# Altium PCB Gear_Trak-v1.0.PcbDoc (part 3 of 5)
Units mil, origin at the board's own origin, x right, y up, seen from the top; angles counter-clockwise.
Board outline 1383 x 2953 mil, 6 copper layers (TOP LAYER, GROUND1, SIGNAL, GROUND2, POWER, BOTTOM LAYER), stack 60.865 mil thick; 166 components, 125 nets, 751 pads, 771 vias.
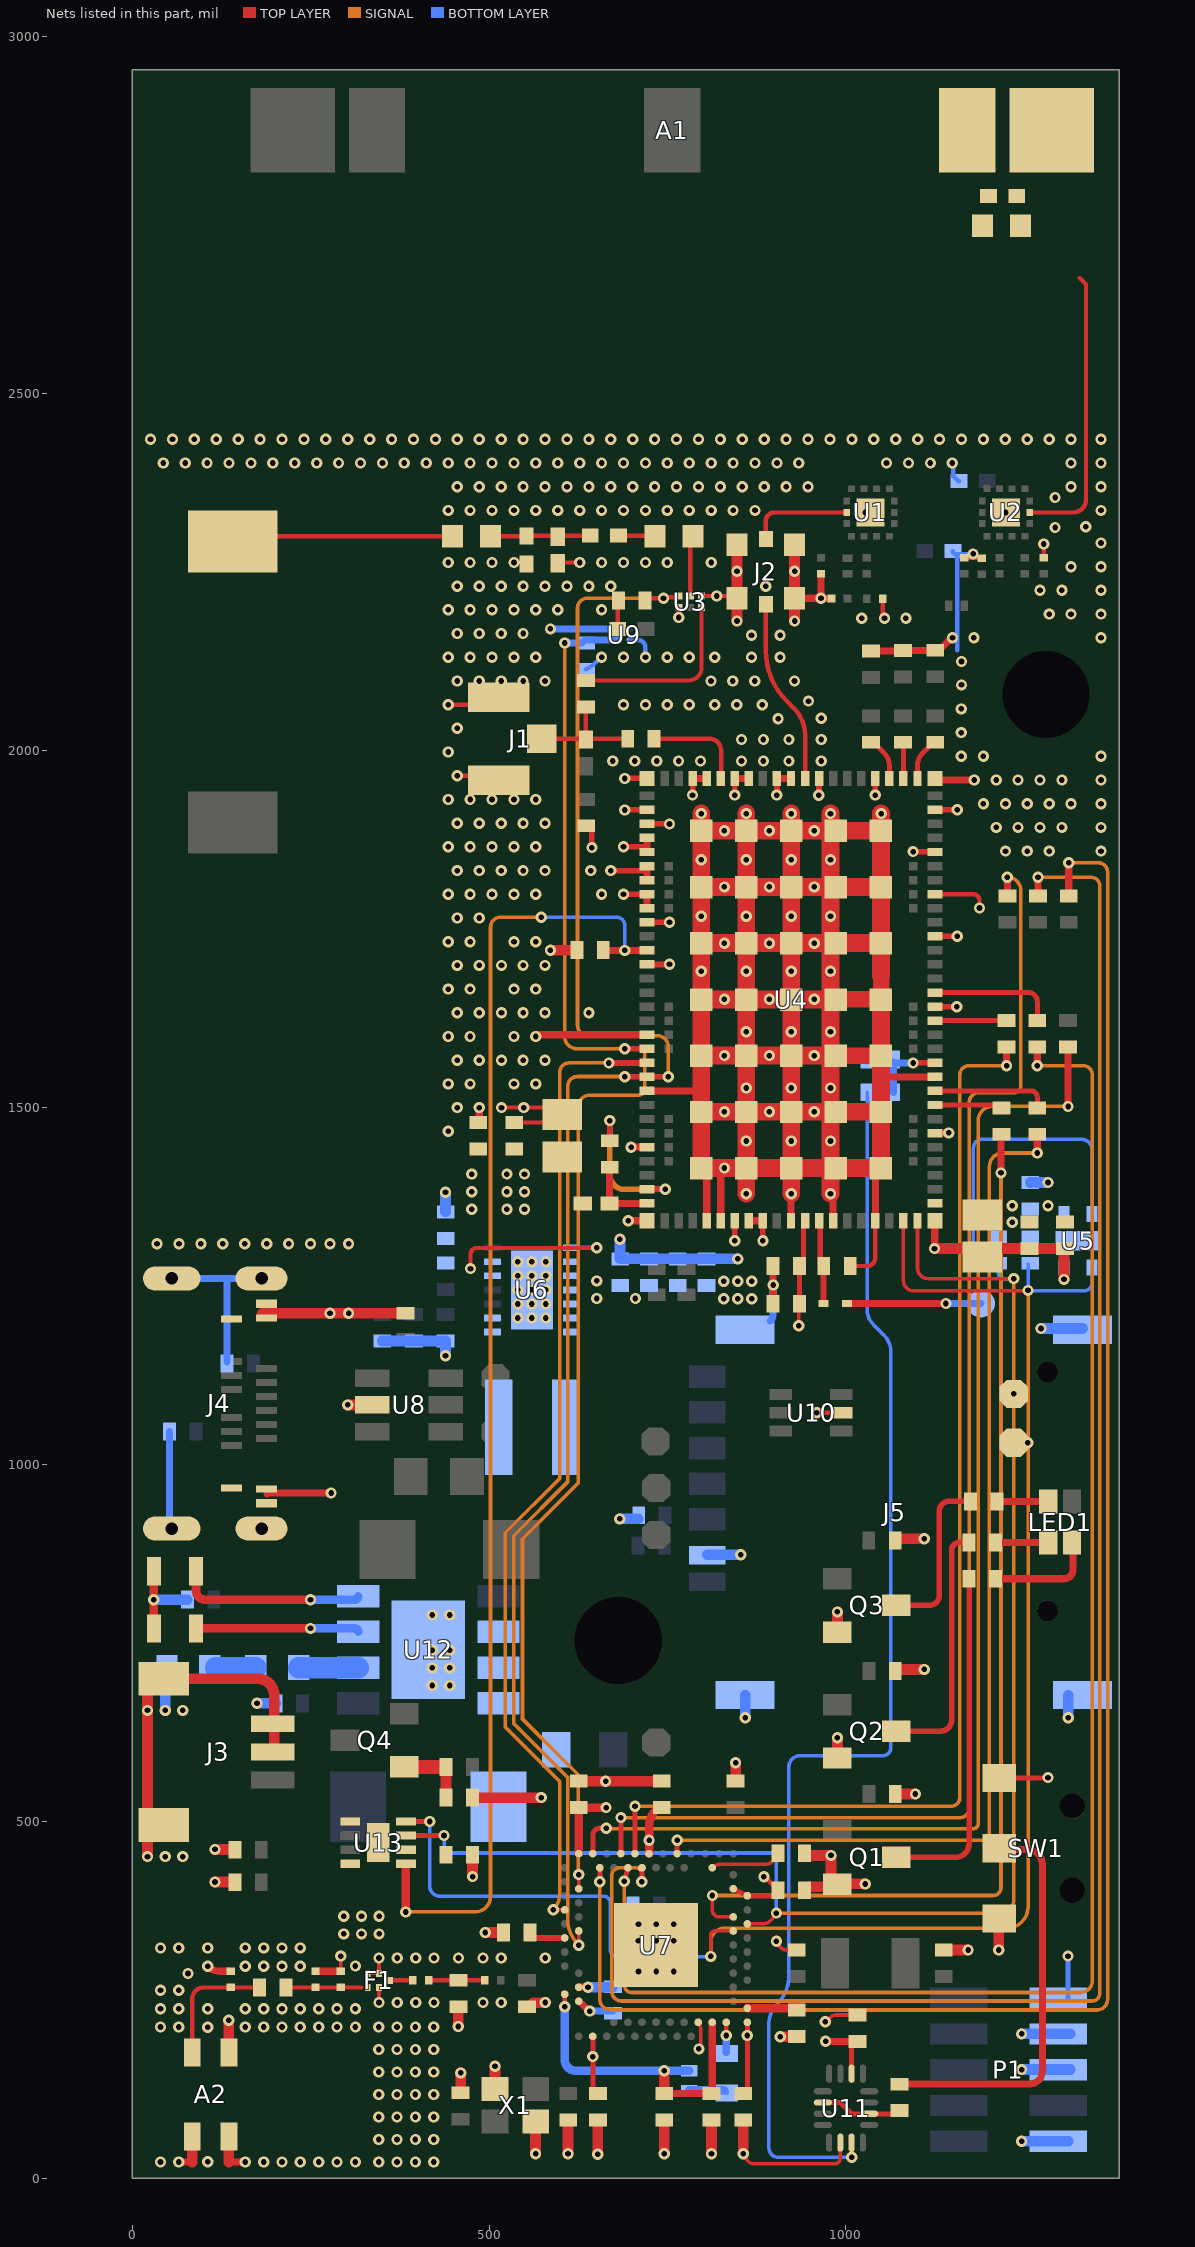
[diagram p6: the nets of this part, all layers, seen from the top]

## Part data (continued)
R15 R16: library part RC0402FR-075K1L, "RES 5.1K OHM 1% 1/16W 0402", Case Code (Imperial)=0402, Case Code (Metric)=1005, LCSC Part Number=C105872, Manufacturer=Yageo, Max Operating Temperature=155°C, Max Power Dissipation=63mW, Min Operating Temperature=-55°C, Package Quantity=1, Resistance=5.1kR, Resistance Tolerance=1%, Resistor Type="Thick Film", Temperature Coefficient=100ppm/°C, Voltage Rating=50V, Case/Package=0402, Category="Chip SMD Resistors", ComponentLink1Description=https://datasheet.ciiva.com/7983/1018594-7983519.pdf?src-supplier=Element14, ComponentLink1URL=https://datasheet.ciiva.com/7983/1018594-7983519.pdf?src-supplier=Element14, ComponentLink2Description=https://datasheet.ciiva.com/46394/1018594-46394936.pdf?src-supplier=Element14, ComponentLink2URL=https://datasheet.ciiva.com/46394/1018594-46394936.pdf?src-supplier=Element14, ComponentLink3Description=https://datasheet.ciiva.com/2453/pyu-r-int-thick-7-2453401.pdf?src-supplier=Digi-Key, ComponentLink3URL=https://datasheet.ciiva.com/2453/pyu-r-int-thick-7-2453401.pdf?src-supplier=Digi-Key, ComponentLink4Description=https://datasheet.ciiva.com/2453/pyu-r-int-thick-7-2453402.pdf?src-supplier=Digi-Key, ComponentLink4URL=https://datasheet.ciiva.com/2453/pyu-r-int-thick-7-2453402.pdf?src-supplier=Digi-Key, ComponentLink5Description=https://datasheet.ciiva.com/2453/pyu-r-int-thick-7-2453400.pdf?src-supplier=Digi-Key, ComponentLink5URL=https://datasheet.ciiva.com/2453/pyu-r-int-thick-7-2453400.pdf?src-supplier=Digi-Key, ComponentLink6Description=https://datasheet.ciiva.com/12558/pyu-rc0402-51-rohs-l-6-r-8721-12558460.pdf?src-supplier=Mouser, ComponentLink6URL=https://datasheet.ciiva.com/12558/pyu-rc0402-51-rohs-l-6-r-8721-12558460.pdf?src-supplier=Mouser, ComponentLink7Description=https://datasheet.ciiva.com/16744/pyu-rc0402-51-rohs-l-6-r-16744283.pdf?src-supplier=Future+Electronics, ComponentLink7URL=https://datasheet.ciiva.com/16744/pyu-rc0402-51-rohs-l-6-r-16744283.pdf?src-supplier=Future+Electronics, ComponentLink8Description=https://datasheet.ciiva.com/15189/getdatasheetpartid-323636-15189493.pdf?src-supplier=Verical, ComponentLink8URL=https://datasheet.ciiva.com/15189/getdatasheetpartid-323636-15189493.pdf?src-supplier=Verical, Construction=Rectangular, Depth=0.5mm, Features="Moisture Resistant", Height=0.016inch, Item Type=Resistor, Lead Free="Lead Free", Length=1mm, Manufacturer Part Number=RC0402FR-075K1L, Military Standard=Not, Number of Terminations=2, Packaging="Tape and Reel", Power Rating=63mW, Pricing 1="10000=0.00085 (USD)", RoHS=Yes, RoHS Compliant=Yes, Series=RC, Stock 1=65000, Supplier 1=Avnet, Supplier Part Number 1=RC0402FR-075K1L, Technology="THICK FILM", Termination=SMD/SMT, Tolerance=1%, Voltage Rating (DC)=50V, Width=0.02inch, Working Voltage=50V
R18 R43 R44: library part RC0402FR-070RL, "RES 0 OHM JUMPER 1/16W 0402", Case Code (Imperial)=0402, Case Code (Metric)=1005, LCSC Part Number=C106231, Manufacturer=Yageo, Max Operating Temperature=155°C, Max Power Dissipation=63mW, Min Operating Temperature=-55°C, Power Rating=62.5mW, Resistor Type="Thick Film", Supplier Part Number 1=603-RC0402FR-070RL, Temperature Coefficient=200ppm/°C, Tolerance=1%, Voltage Rating=50V, Case/Package=0402, ComponentLink1Description=https://datasheet.ciiva.com/8896/pyu-rc0402-51-rohs-l-6-8896149.pdf?src-supplier=Avnet, ComponentLink1URL=https://datasheet.ciiva.com/8896/pyu-rc0402-51-rohs-l-6-8896149.pdf?src-supplier=Avnet, ComponentLink2Description=https://datasheet.ciiva.com/16790/pyu-rc0402-51-rohs-l-6-r-16790444.pdf?src-supplier=Future+Electronics, ComponentLink2URL=https://datasheet.ciiva.com/16790/pyu-rc0402-51-rohs-l-6-r-16790444.pdf?src-supplier=Future+Electronics, Contact Plating=Tin,Matte, Features="Moisture Resistant", Height=0.35mm, Item Type=Resistors, Lead Free="Lead Free", Length=1mm, Manufacturer Part Number=RC0402FR-070RL, Mount="Surface Mount", Number of Terminations=2, Packaging="Tape and Reel", Pricing 1="1=0.10000, 10=0.01400, 50=0.01400, 100=0.00600, 1000=0.00300, 5000=0.00200, 10000=0.00100 (USD)", Radiation Hardening=No, Resistance=0R, RoHS=Yes, RoHS Compliant=Yes, Series=RC, Size Code=0402, Stock 1=8556842, Supplier 1=Mouser, Termination=SMD/SMT, Width=0.5mm
R19 R21: library part RC0402FR-07200RL, "RES 200 OHM 1% 1/16W 0402", Case Code (Imperial)=0402, Case Code (Metric)=1005, LCSC Part Number=C114764, Manufacturer=Yageo, Max Operating Temperature=155°C, Max Power Dissipation=63mW, Min Operating Temperature=-55°C, Package Quantity=1, Resistance Tolerance=1%, Resistor Type="Thick Film", Supplier Part Number 1=311-200LRCT-ND, Temperature Coefficient=100ppm/°C, Voltage Rating=50V, Case/Package=0402, Category="Chip SMD Resistors", ComponentLink1Description=https://datasheet.ciiva.com/2553/pyu-r-int-thick-7-2553232.pdf?src-supplier=Digi-Key, ComponentLink1URL=https://datasheet.ciiva.com/2553/pyu-r-int-thick-7-2553232.pdf?src-supplier=Digi-Key, ComponentLink2Description=https://datasheet.ciiva.com/7983/1018594-7983509.pdf?src-supplier=Element14, ComponentLink2URL=https://datasheet.ciiva.com/7983/1018594-7983509.pdf?src-supplier=Element14, ComponentLink3Description=https://datasheet.ciiva.com/16804/pyu-rc0402-51-rohs-l-6-r-16804406.pdf?src-supplier=Future+Electronics, ComponentLink3URL=https://datasheet.ciiva.com/16804/pyu-rc0402-51-rohs-l-6-r-16804406.pdf?src-supplier=Future+Electronics, ComponentLink4Description=https://datasheet.ciiva.com/15189/getdatasheetpartid-331152-15189383.pdf?src-supplier=Verical, ComponentLink4URL=https://datasheet.ciiva.com/15189/getdatasheetpartid-331152-15189383.pdf?src-supplier=Verical, ComponentLink5Description=https://datasheet.ciiva.com/7849/1018594-7849898.pdf?src-supplier=Element14, ComponentLink5URL=https://datasheet.ciiva.com/7849/1018594-7849898.pdf?src-supplier=Element14, ComponentLink6Description=https://datasheet.ciiva.com/5562/pyu-rc0402-51-rohs-l-6-r-8721-5562539.pdf?src-supplier=Mouser, ComponentLink6URL=https://datasheet.ciiva.com/5562/pyu-rc0402-51-rohs-l-6-r-8721-5562539.pdf?src-supplier=Mouser, ComponentLink7Description=https://datasheet.ciiva.com/7849/1018594-7849899.pdf?src-supplier=Element14, ComponentLink7URL=https://datasheet.ciiva.com/7849/1018594-7849899.pdf?src-supplier=Element14, ComponentLink8Description=https://datasheet.ciiva.com/2553/pyu-r-int-thick-7-2553230.pdf?src-supplier=Digi-Key, ComponentLink8URL=https://datasheet.ciiva.com/2553/pyu-r-int-thick-7-2553230.pdf?src-supplier=Digi-Key, ComponentLink9Description=https://datasheet.ciiva.com/2553/pyu-r-int-thick-7-2553231.pdf?src-supplier=Digi-Key, ComponentLink9URL=https://datasheet.ciiva.com/2553/pyu-r-int-thick-7-2553231.pdf?src-supplier=Digi-Key, Construction=Rectangular, Depth=0.5mm, Features="Moisture Resistant", Height=0.016inch, Lead Free="Lead Free", Length=1mm, Manufacturer Part Number=RC0402FR-07200RL, Military Standard=Not, Number of Terminations=2, Packaging="Tape and Reel", Power Rating=63mW, Pricing 1="1=0.10000, 10=0.01600, 100=0.00660, 1000=0.00299, 2500=0.00259, 5000=0.00214 (USD)", REACH SVHC="No SVHC", Resistance=200R, RoHS=Yes, RoHS Compliant=Yes, Series=RC, Size Code=0402, Stock 1=19778, Supplier 1=Digi-Key, Termination=SMD/SMT, Tolerance=1%, Voltage Rating (DC)=50V, Width=0.02inch
R20: library part RK73H1ETTP3300F, "RES 330 OHM 1% 1/10W 0402", Case Code (Imperial)=0402, Case Code (Metric)=1005, LCSC Part Number=C159971, Manufacturer="KOA Speer", Max Operating Temperature=155°C, Max Power Dissipation=100mW, Min Operating Temperature=-55°C, Package Quantity=10000, Power Rating=63mW, Ratings=AEC-Q200, Supplier Part Number=6317972, Temperature Coefficient=100ppm/°C, Tolerance=1%, Voltage Rating=50V, Case/Package=0402, Category="Chip SMD Resistors", ComponentLink1Description=https://datasheet.ciiva.com/5555/rk73h-5555909.pdf?src-supplier=Mouser, ComponentLink1URL=https://datasheet.ciiva.com/5555/rk73h-5555909.pdf?src-supplier=Mouser, ComponentLink2Description=https://datasheet.ciiva.com/15203/getdatasheetpartid-424481-15203100.pdf?src-supplier=Verical, ComponentLink2URL=https://datasheet.ciiva.com/15203/getdatasheetpartid-424481-15203100.pdf?src-supplier=Verical, Construction=Rectangular, Features="Moisture Resistant,Automotive AEC-Q200", Height=0.35mm, Lead Free="Lead Free", Length=1mm, Manufacturer Part Number=RK73H1ETTP3300F, Military Standard=Not, Number of Terminations=2, Packaging="Tape and Reel", Pricing="100=0.007, 1000=0.006, 2500=0.006, 5000=0.006, 10000=0.005 (GBP)", RoHS=Yes, RoHS Compliant=Yes, Series=RK73H, Stock=36500, Supplier=Rs, Termination=SMD/SMT, Voltage Rating (DC)=50V, Width=0.5mm
R26: library part RC0805FR-071KL, "RES 1K OHM 1% 1/8W 0805", Case Code (Imperial)=0805, Case Code (Metric)=2012, LCSC Part Number=C95781, Manufacturer=Yageo, Max Operating Temperature=155°C, Max Power Dissipation=125mW, Min Operating Temperature=-55°C, Package Quantity=1, Resistance Tolerance=1%, Resistor Type="Thick Film", Supplier Part Number=8126013, Temperature Coefficient=100ppm/°C, Voltage Rating=150V, Case/Package=0805, Category="Chip SMD Resistors", ComponentLink1Description=https://datasheet.ciiva.com/7941/1686128-7941719.pdf?src-supplier=Element14, ComponentLink1URL=https://datasheet.ciiva.com/7941/1686128-7941719.pdf?src-supplier=Element14, ComponentLink2Description=https://datasheet.ciiva.com/46385/444164-46385020.pdf?src-supplier=Element14, ComponentLink2URL=https://datasheet.ciiva.com/46385/444164-46385020.pdf?src-supplier=Element14, ComponentLink3Description=https://datasheet.ciiva.com/2456/pyu-r-int-thick-7-2456976.pdf?src-supplier=Digi-Key, ComponentLink3URL=https://datasheet.ciiva.com/2456/pyu-r-int-thick-7-2456976.pdf?src-supplier=Digi-Key, ComponentLink4Description=https://datasheet.ciiva.com/2456/pyu-r-int-thick-7-2456977.pdf?src-supplier=Digi-Key, ComponentLink4URL=https://datasheet.ciiva.com/2456/pyu-r-int-thick-7-2456977.pdf?src-supplier=Digi-Key, ComponentLink5Description=https://datasheet.ciiva.com/2456/pyu-r-int-thick-7-2456975.pdf?src-supplier=Digi-Key, ComponentLink5URL=https://datasheet.ciiva.com/2456/pyu-r-int-thick-7-2456975.pdf?src-supplier=Digi-Key, ComponentLink6Description=https://datasheet.ciiva.com/16850/rc0805-16850409.pdf?src-supplier=Future+Electronics, ComponentLink6URL=https://datasheet.ciiva.com/16850/rc0805-16850409.pdf?src-supplier=Future+Electronics, Construction=Rectangular, Depth=1.25mm, Features="Moisture Resistant", Height=0.024inch, Item Type=Resistor, Lead Free=5697LeadFree, Length=0.079inch, Manufacturer Part Number=RC0805FR-071KL, Military Standard=Not, Number of Terminations=2, Packaging="Tape and Reel", Pins=2, Power Rating=125mW, Pricing="5000=0.117, 25000=0.112, 125000=0.107, 500000=0.104, 1250000=0.0981 (USD)", Reach SVHC Compliant=No, RoHS=Yes, RoHS Compliant=Yes, Series=RC, Stock=8305000, Supplier="Future Electronics", Termination=SMD/SMT, Tolerance=1%, Voltage Rating (AC)=150V, Voltage Rating (DC)=150V, Width=0.049inch
R27: library part FRC0603F9530TS, "100mW Thick Film Resistors 75V ±100ppm/℃ ±1% 953Ω 0603 Chip Resistor - Surface Mount ROHS", LCSC Part Number=C2933268, Manufacturer=FOJAN, Package=0603, ComponentLink1Description=LCSC, ComponentLink1URL=https://www.lcsc.com/product-detail/Chip-Resistor-Surface-Mount_FOJAN-FRC0603F9530TS_C2933268.html, Item Type=Resistor, Manufacturer Part Number=FRC0603F9530TS
R28: library part RC0603FR-0715RL, "RES 15 OHM 1% 1/10W 0603", Current Rating=50mA, LCSC Part Number=C128059, Manufacturer=Yageo, Supplier Part Number=6308514, Voltage Rating (AC)=50V, Category="Chip SMD Resistors", ComponentLink1Description=https://datasheet.ciiva.com/5989/1686128-5989704.pdf?src-supplier=Farnell, ComponentLink1URL=https://datasheet.ciiva.com/5989/1686128-5989704.pdf?src-supplier=Farnell, ComponentLink2Description=https://datasheet.ciiva.com/8890/pyu-rc0603-51-rohs-l-4-8890742.pdf?src-supplier=Avnet, ComponentLink2URL=https://datasheet.ciiva.com/8890/pyu-rc0603-51-rohs-l-4-8890742.pdf?src-supplier=Avnet, ComponentLink3Description=https://datasheet.ciiva.com/12557/rc0603-272842-12557839.pdf?src-supplier=Mouser, ComponentLink3URL=https://datasheet.ciiva.com/12557/rc0603-272842-12557839.pdf?src-supplier=Mouser, ComponentLink4Description=https://datasheet.ciiva.com/2454/pyu-r-int-thick-7-2454840.pdf?src-supplier=Digikey, ComponentLink4URL=https://datasheet.ciiva.com/2454/pyu-r-int-thick-7-2454840.pdf?src-supplier=Digikey, ComponentLink5Description=https://datasheet.ciiva.com/2454/pyu-r-int-thick-7-2454841.pdf?src-supplier=Digikey, ComponentLink5URL=https://datasheet.ciiva.com/2454/pyu-r-int-thick-7-2454841.pdf?src-supplier=Digikey, ComponentLink6Description=https://datasheet.ciiva.com/2454/pyu-r-int-thick-7-2454842.pdf?src-supplier=Digikey, ComponentLink6URL=https://datasheet.ciiva.com/2454/pyu-r-int-thick-7-2454842.pdf?src-supplier=Digikey, ComponentLink7Description=https://datasheet.ciiva.com/7746/443971-7746262.pdf?src-supplier=Element14, ComponentLink7URL=https://datasheet.ciiva.com/7746/443971-7746262.pdf?src-supplier=Element14, ComponentLink8Description=https://datasheet.ciiva.com/7746/443971-7746263.pdf?src-supplier=Element14, ComponentLink8URL=https://datasheet.ciiva.com/7746/443971-7746263.pdf?src-supplier=Element14, Contact Material=157ConductorMaterial, Item Type=Resistor, Lead Free=5697LeadFree, Manufacturer Part Number=RC0603FR-0715RL, Pricing="5000=0.0011, 75000=0.001, 200000=0.001, 500000=0.001, 1250000=0.0009 (USD)", RoHS=Yes, Stock=5830000, Supplier="Future Electronics", Weight=250mg
R31 R32: library part RC0402FR-074K7L, "RES 4.7K OHM 1% 1/16W 0402", Case Code (Imperial)=0402, Case Code (Metric)=1005, LCSC Part Number=C105871, Manufacturer=Yageo, Max Operating Temperature=155°C, Max Power Dissipation=63mW, Min Operating Temperature=-55°C, Power Rating=62.5mW, Resistance=4.7kR, Resistance Tolerance=1%, Resistor Type="Thick Film", Temperature Coefficient=100ppm/°C, Voltage Rating=50V, Case/Package=0402, Category="Chip SMD Resistors", ComponentLink1Description=https://datasheet.ciiva.com/22661/1686128-22661342.pdf?src-supplier=Element14, ComponentLink1URL=https://datasheet.ciiva.com/22661/1686128-22661342.pdf?src-supplier=Element14, ComponentLink2Description=https://datasheet.ciiva.com/7850/1018594-7850022.pdf?src-supplier=Element14, ComponentLink2URL=https://datasheet.ciiva.com/7850/1018594-7850022.pdf?src-supplier=Element14, ComponentLink3Description=https://datasheet.ciiva.com/7850/1018594-7850023.pdf?src-supplier=Element14, ComponentLink3URL=https://datasheet.ciiva.com/7850/1018594-7850023.pdf?src-supplier=Element14, ComponentLink4Description=https://datasheet.ciiva.com/15215/getdatasheetpartid-328119-15215035.pdf?src-supplier=Verical, ComponentLink4URL=https://datasheet.ciiva.com/15215/getdatasheetpartid-328119-15215035.pdf?src-supplier=Verical, Construction=Rectangular, Depth=0.5mm, Features="Moisture Resistant", Height=0.32mm, Height - Seated (Max)=0.016inch, Item Type=Resistor, Lead Free="Lead Free", Length=1mm, Manufacturer Part Number=RC0402FR-074K7L, Military Standard=Not, Number of Pins=2, Number of Terminations=2, Packaging="Tape and Reel", Pricing 1="10000=0.00085 (USD)", Reach SVHC Compliant=Yes, RoHS=Yes, RoHS Compliant=Yes, Series=RC, Size Code=0402, Stock 1=2420000, Supplier 1=Avnet, Supplier Part Number 1=RC0402FR-074K7L, Termination=SMD/SMT, Tolerance=1%, Voltage Rating (DC)=50V, Width=0.5mm
SW1: library part AYZ0102AGRLC, "Miniature slide switch, SPDT, Right-Angle, ON-ON, 12V, 100mA", Digikey Part Number=401-2012-1-ND, LCSC=C92658, ComponentLink1Description=Datasheet, ComponentLink1URL=https://www.ckswitches.com/media/1431/ayz.pdf, ComponentLink2Description="Supplier link", ComponentLink2URL=N.A.
TP1: library part TP_SMD_Ø1.0MM, "1.0mm circular SMD testpad", Manufacturer="Nordic Semiconductor", Manufacturer Part Number=N.A., Artikkelnr Noca=N.A., Component Class=Connectors, ComponentLink1Description=Datasheet, ComponentLink1URL=N.A., ComponentLink2Description="Supplier link", ComponentLink2URL=N.A., Footprint Doc=TP_SMD_Ø1.0mm, HelpURL=N.A., LatestRevisionDate=2013-06-11, Note=N.A., Pad Count=1, PartId=100500475, Part Number=TP_SMD_Ø1.0MM, Part number IPS=N.A., Published=2013-06-11, Supplier 1=N.A., Supplier 2=N.A., Supplier Part Number 1=N.A., Supplier Part Number 2=N.A.
TP2 TP3 TP4 TP5 TP6 TP7 TP8 TP9: "Test Point ON", Item Type="Test Point", Manufacturer Part Number="TEST POINT 0.5mm Dia"
U1 U2: library part QM12038, "SP8T Switch For 3G/4G Applications", LCSC=C150871, Package=QFN-14, ComponentLink1Description=Datasheet, ComponentLink1URL="\\hizz\pro\app9717\Datasheet\integated circuits\qorvo\QM12038 Datasheet.pdf", ComponentLink2Description="Supplier link", ComponentLink2URL=N.A.
U3: library part BGA524N6E6327XTSA1, "GPS/GNSS Low-Noise Amplifier, 19.6dB Gain, 0.55dB Noise Figure, 1.5V to 3.3V Supply Range", Digikey Part Number=BGA524N6E6327XTSA1CT-ND, LCSC=C534158, Manufacturer="Infineon Technologies", Package=XFDFN-6, Part number IPS=00000004011, Component Class=Misc_ICs, ComponentLink1Description=Datasheet, ComponentLink1URL=https://www.infineon.com/dgdl/Infineon-BGA524N6-DS-v03_00-en.pdf?fileId=db3a304344e406b50144e44dfad302b9, ComponentLink2Description="Supplier link", ComponentLink2URL=N.A., HelpURL=https://www.infineon.com/cms/en/product/rf-wireless-control/low-noise-amplifier-lna-ics/gps-glonass-compass-lna/bga524n6/, LatestRevisionDate=2019-10-25, Manufacturer Part Number=BGA524N6E6327XTSA1, Note=N.A., Pad Count=6, PartId=101900596, Published=2019-10-25, Supplier Part Number 1=BGA524N6E6327XTSA1CT-ND, Supplier Part Number 2=726-A524N6E6327XTSA1
U4: "Low power System-in-Package with integrated LTE-M/NB-IoT modem and GPS", Digikey Part Number=4823-NRF9160-SICA-B1A-RCT-ND, LCSC=NILL, Manufacturer="Nordic Semiconductor", Part number IPS=80000002329, Artikkelnr Noca=N.A., Component Class=nRF_Devices, ComponentLink1Description=Datasheet, ComponentLink1URL=N.A., ComponentLink2Description="Supplier link", ComponentLink2URL=N.A., Footprint Doc=LGA-161, HelpURL=N.A., LatestRevisionDate=2020-08-13, Manufacturer Part Number=nRF9160-SICAB1A, Note=N.A., Pad Count=161, PartId=102000165, Part Number=nRF9160-SICAB1A, Published=2020-08-13, Supplier 1="Nordic Semiconductor", Supplier 2=N.A., Supplier Part Number 1=nRF9160-SICAB1A, Supplier Part Number 2=N.A.
U5: "SHTC3 Series Digital ±2% RH SMT Humidity Temperature Sensor - DFN-8", LCSC Part Number=C194656, Manufacturer=Sensirion, ComponentLink1Description=https://datasheet.octopart.com/SHTC3-TR-2.5KS-Sensirion-datasheet-166628637.pdf?src-supplier=Future+Electronics, ComponentLink1URL=https://datasheet.octopart.com/SHTC3-TR-2.5KS-Sensirion-datasheet-166628637.pdf?src-supplier=Future+Electronics, Item Type=IC, Manufacturer Part Number=SHTC3-TR-2.5KS, Pricing="1=2.72, 5=2.292, 10=2.129, 25=1.932, 50=1.7952, 100=1.6682, 500=1.40712, 1000=1.30776 (USD)", RoHS=No, Stock=21685, Supplier=Digikey
U6: "IC REG BUCK BST 3.3V 3.5A 14VSON", Case/Package=VSON, LCSC Part Number=C202140, Manufacturer="Texas Instruments", Max Operating Temperature=85°C, Max Output current=3A, Max Supply Voltage=5.5V, Min Input Voltage=1.8V, Min Operating Temperature=-40°C, Output Voltage=3.3V, Package Quantity=1, Quiescent Current=50uA, Switching Frequency=2.4MHz, ComponentLink1Description=https://datasheet.ciiva.com/2026/tps63021-2026362.pdf?src-supplier=Digikey, ComponentLink1URL=https://datasheet.ciiva.com/2026/tps63021-2026362.pdf?src-supplier=Digikey, ComponentLink2Description=https://datasheet.ciiva.com/2026/tps63021-2026361.pdf?src-supplier=Digikey, ComponentLink2URL=https://datasheet.ciiva.com/2026/tps63021-2026361.pdf?src-supplier=Digikey, ComponentLink3Description=https://datasheet.ciiva.com/2026/tps63021-2026363.pdf?src-supplier=Digikey, ComponentLink3URL=https://datasheet.ciiva.com/2026/tps63021-2026363.pdf?src-supplier=Digikey, ComponentLink4Description=https://datasheet.ciiva.com/3221/tps63020-3221510.pdf?src-supplier=Avnet, ComponentLink4URL=https://datasheet.ciiva.com/3221/tps63020-3221510.pdf?src-supplier=Avnet, Efficiency=96%, Item Type=IC, Lead Free="Lead Free", Manufacturer Part Number=TPS63021DSJR, Mounting Technology="Surface Mount", Number of Outputs=1, Operating Supply Voltage=5.5V, Output Current=3A, Output Type=Fixed, Packaging="Cut Tape", Pins=14, Pricing="1=2.63, 10=1.96, 50=1.8, 100=1.61, 1000=1.43, 10000=1.35 (USD)", Reach SVHC Compliant=No, RoHS=Yes, RoHS Compliant=Yes, Series=-, Stock=4678, Supplier=Mouser, Synchronous Rectifier=Yes
U7: "AQFN-73-EP(7x7) RF Transceiver ICs ROHS", LCSC=C190794, Package=QFN-73
U8: "6A 12V 150W 6V Unidirectional 5V SOT-23-6 ESD and Surge Protection (TVS/ESD) ROHS", LCSC Part Number=C2827654, Manufacturer="TECH PUBLIC", Package=SOT-23-6, ComponentLink1Description=LCSC, ComponentLink1URL=https://www.lcsc.com/product-detail/ESD-and-Surge-Protection-TVS-ESD_TECH-PUBLIC-USBLC6-2SC6_C2827654.html, Item Type=(TVS/ESD), Manufacturer Part Number=USBLC6-2SC6
U9: "1.0 A Load Switch IC with Slew Rate Control Driver in Ultra Small Package", LCSC=C146305, Manufacturer=Toshiba, Manufacturer Part Number=TCK106AG,LF, Part number IPS=00000004390, Supplier Part Number 1=TCK106AGLFTR-ND, Artikkelnr Noca=N.A., Component Class=Misc_ICs, ComponentLink1Description=Datasheet, ComponentLink1URL=https://toshiba.semicon-storage.com/info/docget.jsp?did=30131&prodName=TCK106AG, ComponentLink2Description="Supplier link", ComponentLink2URL=N.A., Footprint Doc=WLCSP-4, HelpURL=N.A., LatestRevisionDate=2019-03-01, Note=N.A., Pad Count=4, PartId=101900575, Part Number=TCK106AG, Published=2019-02-17, Supplier 1=Digi-Key, Supplier 2=Mouser, Supplier Part Number 2=757-TCK106AGLF
U10: "TVS DIODE 5VWM 12.5VC SC70-6", Capacitance=130pF, Case/Package=SC, Clamping Voltage=12.5V, LCSC=C85191, Leakage Current=5uA, Manufacturer=Semtech, Max Breakdown Voltage=6V, Max Operating Temperature=125°C, Min Operating Temperature=-55°C, Operating Supply Voltage=5V, Peak Pulse Current=8A, Peak Pulse Power=100W, Power Line Protection=No, Resistor Type=Zener, Supplier Part Number 1=SMF05CCT-ND, Test Current=1mA, Category="TVS Diodes", Clamping Voltage-Max=12.5V, ComponentLink1Description=https://datasheet.ciiva.com/338/smf05c-338385.pdf?src-supplier=Digi-Key, ComponentLink1URL=https://datasheet.ciiva.com/338/smf05c-338385.pdf?src-supplier=Digi-Key, ComponentLink2Description=https://datasheet.ciiva.com/18065/getdatasheetpartid-89007-18065142.pdf?src-supplier=Verical, ComponentLink2URL=https://datasheet.ciiva.com/18065/getdatasheetpartid-89007-18065142.pdf?src-supplier=Verical, ComponentLink3Description=https://datasheet.ciiva.com/338/smf05c-338386.pdf?src-supplier=Digi-Key, ComponentLink3URL=https://datasheet.ciiva.com/338/smf05c-338386.pdf?src-supplier=Digi-Key, ComponentLink4Description=https://datasheet.ciiva.com/338/smf05c-338387.pdf?src-supplier=Digi-Key, ComponentLink4URL=https://datasheet.ciiva.com/338/smf05c-338387.pdf?src-supplier=Digi-Key, ComponentLink5Description=https://datasheet.ciiva.com/16387/smf05c-16387308.pdf?src-supplier=Future+Electronics, ComponentLink5URL=https://datasheet.ciiva.com/16387/smf05c-16387308.pdf?src-supplier=Future+Electronics, Depth=1.25mm, Diode Type=ZENER, Direction=Unidirectional, Element Configuration="Common Anode", ESD Protection=Yes, Height=0.9mm, Lead Free="Lead Free", Length=2mm, Manufacturer Part Number=SMF05C.TCT, Max Reverse Leakage Current=5uA, Min Breakdown Voltage=6V, Mount="Surface Mount", Number of Channels=5, Number of Elements=5, Number of Pins=6, Number of Unidirectional Channels=5, Packaging="Tape and Reel", Polarity=Unidirectional, Pricing 1="1=0.79000, 10=0.69300, 100=0.53130, 500=0.42000, 1000=0.33600 (USD)", Radiation Hardening=No, Reverse Breakdown Voltage=6V, Reverse Standoff Voltage=5V, RoHS=Yes, RoHS Compliant=Yes, Series=SMF, Stock 1=164885, Supplier 1=Digi-Key, Voltage Rating (DC)=5V, Width=1.25mm, Working Voltage=5V
U11: "Data / Audio Low-Voltage Dual DPDT Analog Switch", LCSC=C457657, Manufacturer="ON Semiconductor", Part number IPS=00000009986, Supplier Part Number 1=FSA2466UMXCT-ND, Artikkelnr Noca=15070069, Component Class=Misc_ICs, ComponentLink1Description=Datasheet, ComponentLink1URL=N.A., ComponentLink2Description="Supplier link", ComponentLink2URL=N.A., Footprint Doc=UFQFN-16, HelpURL=https://www.onsemi.com/pub/Collateral/FSA2466-D.PDF, LatestRevisionDate=2019-05-15, Manufacturer Part Number=FSA2466UMX, Note=N.A., Pad Count=16, PartId=101900422, Part Number=FSA2466UMX, Published=2016-05-18, Supplier 1=Digi-Key, Supplier 2=Mouser, Supplier Part Number 2=512-FSA2466UMX
U12: "4V~6V Polymer 1 3.5A SOP-8-EP Battery Management ICs ROHS", LCSC Part Number=C130316, Manufacturer=SOLA-IC, Package=SOP-8-EP, ComponentLink1Description=LCSC, ComponentLink1URL=https://www.lcsc.com/product-detail/Battery-Management-ICs_SOLA-IC-SLM6600_C130316.html, Item Type=IC, Manufacturer Part Number=SLM6600
U13: "IC BATT MON LI-ION 1CELL 8TDFN", LCSC Part Number=C2682616, Manufacturer=Maxim, Max Operating Temperature=85°C, Min Operating Temperature=-20°C, Operating Supply Current=23uA, Operating Supply Voltage=4.5V, Output Voltage=400mV, Package Quantity=10000, Supplier Part Number 1=700-MAX17048G+T10, Category="Battery Management", ComponentLink1Description=https://datasheet.ciiva.com/14083/max17048-max17049-14083973.pdf?src-supplier=Digi-Key, ComponentLink1URL=https://datasheet.ciiva.com/14083/max17048-max17049-14083973.pdf?src-supplier=Digi-Key, Contact Plating=Tin,Matte, Item Type=IC, Manufacturer Part Number=MAX17048G+T10, Mount="Surface Mount", Number of Pins=8, Packaging="Tape and Reel", Pricing 1="1=3.34000, 10=3.00000, 50=2.84000, 100=2.46000, 1000=1.89000, 10000=1.83000 (USD)", Radiation Hardening=No, RoHS=Yes, RoHS Compliant=Yes, Series=ModelGauge™, Stock 1=41293, Supplier 1=Mouser
X1: library part XTAL_SMD2016_32MHz_8pF_Murata, "XTAL SMD 2016, 32MHz, Cl=8pF, Tol: ±10ppm, Stab: ±10ppm", LCSC=C2965582, Package=SMD-2016, ComponentLink1Description=Datasheet, ComponentLink1URL=N.A., ComponentLink2Description="Supplier link", ComponentLink2URL=N.A.
X2: library part Q13FC13500049, "Crystal, 32.768KHZ, 6PF, 3.2MM X 1.5MM Rohs Compliant: Yes", LCSC Part Number=C95361, Manufacturer=Epson, Item Type=Crystal, Manufacturer Part Number=Q13FC13500049, Pricing="100=5.52, 250=5.41 (DKK)", RoHS=No, Stock=760, Supplier=Farnell

## Free pads (board coordinates)
  round 0 hole 122.05: MH1(681,753) MH1(1280,2078)

## Via types
v1: diameter 15.75, hole 7.87, TOP LAYER to BOTTOM LAYER, tented both sides, 771 vias

## Nets (pads, with @x,y where several pads share a name; then routed paths per layer and width w, separated by ;. In a path a pad name is that pad's centre, name@x,y a point inside that pad or via, vN(x,y) a via of type N, cw(c..) or ccw(c..) an arc to the next point about the centre after c; other vN are vias at no path point)
+3V3: C14.2 C15.1 C16.1 C17.1 C18.1 C20.2 C21.1 C22.1 C25.1 C29.1 C31.2 C38.1 C40.1 C42.1 C45.2 C46.2 C47.2 C48.2 C60.1 FB1.1 P1.1 R29.1 R31.1 R32.1 SW1.3 U4.12 U4.22 U5.1 U6.3 U6.4 U6.5 U7.A22 U7.AD14 U7.AD23 U7.B1 U7.W1 U7.Y2 U9.A2 U11.14 | length 942.1
  TOP LAYER w5: v1(934,1194) 934,1223.66 cw(c934.98,1223.66) C18.1@934.98,1224.63
  TOP LAYER w7: U7.A22@645.31,198.54 645.31,123.78 C29.1@652.64,118.28 ; U7.AD14@724.06,454.45 U7.AD14@724.12,454.52 ; v1@724.12,474.12 v1@724.19,474.19 ; U7.Y2@842.17,405.24 U7.W1@861.85,395.39 C38.1@901.52,395.39 ; C31.2@856,118.5 ccw(c856,124.35) 861.85,124.35 U7.B1@861.85,218.23 ; v1(885,422) cw(c885,419.51) 886.75,421.28 C38.1@904.93,403.1 ; C18.1@934.98,1224.63 C17.1@934.99,1277.45 ; C17.1@940.61,1277.63 940.61,1338.86 U4.12@942.68,1340.94 ; v1(971.44,191.66) v1@971.52,191.58 ; U11.14@1007.87,146.23 1007.87,186 C60.1@1013.37,191.5 ; C60.1@1015.83,191.58 C60.1@1015.91,191.5 ; SW1.3@1214.64,560.48 1281.74,560.48 ccw(c1281.74,562.26) v1(1283,561)
  TOP LAYER w10: v1@971.52,191.58 C60.1@1015.83,191.58
  TOP LAYER w12: U7.AD23@625.5,454.58 C40.1@625.5,516 ; C40.1@625.63,519 v1(664,519) ; U7.AD14@724.12,454.52 v1@724.12,474.12 ; v1@724.19,474.19 724.19,491.3 cw(c761.12,491.3) C42.1@735.01,517.42
  TOP LAYER w15: v1(586,1720) R29.1@623,1720
  BOTTOM LAYER w7: P1.1@1311,252.03 v1(1311,311)
  BOTTOM LAYER w10: v1(586,2170) U9.A2@681.3,2170
  other v1: 645.31,170.15 861.85,199.79 724.19,473.19 651,1232 705,1232 828.63,1231.63 848.31,1231.63 868,1231.63 651,1256.69 828.63,1256.32 848.31,1256.32 868,1256.32 1233,1338.88 475.63,1357 525,1357 549.69,1357 1233,1362 1283,1362 475.63,1381.69 525,1381.69 549.69,1381.69 475.63,1406.37 525,1406.37 549.69,1406.37
ANT_GPS: C8.2 C9.1 L7.1 L8.2 | length 140
  TOP LAYER w6.17: L7.1@502.23,2299.54 552.02,2299.54 C9.1@552.7,2300.23 L8.2@596.25,2300.23 ; L8.2@596.27,2300.25 641.5,2300.25 C8.2@641.8,2300.54
ANT_LTE: A1.1 C1.1 L1.1 U2.13 | length 403.4
  TOP LAYER w6.17: U2.13@1257.17,2333.07 1318.18,2333.07 ccw(c1318.18,2351.12) 1336.23,2351.12 1336.23,2652.69 1327.44,2661.48
BAT_ALERT: R29.2 U4.84 U13.5 | length 1855.7
  TOP LAYER w5: R29.2@660,1719.68 R29.2@660,1720
  TOP LAYER w10: R29.2@660,1719.68 v1(690.13,1719.68) U4.84@721.43,1719.68
  TOP LAYER w12: v1(383.5,372.79) 383.57,372.86 383.57,440.41 U13.5@383.64,440.47
  SIGNAL w5: v1(383.5,372.79) 480.16,372.79 ccw(c480.16,394.68) 502.05,394.68 502.05,1752.33 cw(c515.72,1752.33) 515.72,1766 v1(573,1766)
  BOTTOM LAYER w5: v1(573,1766) 679,1766 cw(c679,1755) 690,1755 690,1719.68 v1(690.13,1719.68)
BLE_ANT: A2.1 C36.2 R18.1 | length 178.3
  TOP LAYER w6.17: A2.1@84.35,176.16 84.35,251.32 cw(c100.03,251.32) 100.03,267 138,267 158,267 R18.1@178.5,267
BLE_RF: F1.1 L12.2 | length 31.5
  TOP LAYER w6.17: F1.1@361.59,277.08 L12.2@393.13,277.08
COEX0: R3.2 U3.6 U4.93 U7.P23 | length 2386.8
  TOP LAYER w5: v1@625.62,326.27 U7.P23@625.63,346.18
  TOP LAYER w6.17: R3.2@718.5,2210 721.51,2213.01 v1@744.21,2213.01 ; v1(744.34,2212.88) 745.71,2214.26 764.34,2214.26 U3.6@766.13,2216.04
  TOP LAYER w7.87: v1@690.13,1542.65 v1@751,1542.65
  SIGNAL w5: v1(625.61,326.26) cw(c663.29,363.94) 610,363.94 610,561.56 534.85,636.71 534.85,899.85 610,975 610,1529 cw(c624,1529) 624,1543 690,1543 v1(690,1542.78) ; v1(744.34,2212.88) 637.53,2212.88 ccw(c637.53,2199.32) 623.97,2199.32 623.97,1615.03 ccw(c639,1615.03) 639,1600 736,1600 cw(c736,1585) 751,1585 v1@751,1543
  other v1: 751,1542.78
COEX1: U4.92 U7.U24 | length 1383.9
  TOP LAYER w5: v1@590,375.71 U7.U24@605.94,375.71
  TOP LAYER w7.87: v1(667.93,1562) U4.92@721.23,1562
  SIGNAL w5: v1(590,376) ccw(c568.27,397.73) 599,397.73 599,555.62 522.85,631.77 522.85,903.85 599,980 599,1548.6 cw(c612.4,1548.6) 612.4,1562 v1(667.93,1562)
COEX2: R34.2 U4.91 U7.Y23 U9.B2 | length 2102.7
  TOP LAYER w5: U7.Y23@625.63,405.24 v1@625.64,425.15
  TOP LAYER w7.87: v1@690.27,1581.88 U4.91@721.43,1581.88
  SIGNAL w5: v1(606,2150.25) 606,1599 ccw(c622.98,1599) 622.98,1582.02 v1(690.13,1582.02) 709.98,1582.02 cw(c709.98,1574) 718,1574 718,1525 cw(c710,1525) 710,1517 641,1517 ccw(c641,1501.12) 625.12,1501.12 624.92,1500.92 624.92,973.56 546.85,895.49 546.85,643.07 624.92,565 624.92,425.89 v1(625.65,425.16)
  BOTTOM LAYER w5: R34.2@630,2150.25 ccw(c630,2154.25) R34.2@634,2154.25
  BOTTOM LAYER w10: v1(606,2150.25) R34.2@630,2150.25 ; R34.2@634,2154.25 U9.B2@681.3,2154.25
DEC0: C19.1 D1.2 U4.13 | length 119
  TOP LAYER w7.87: U4.13@962.37,1340.94 964.14,1339.17 964.14,1282.19 C19.1@968.87,1277.45 968.46,1277.45 D1.2@968.46,1225
DEC1: C30.1 U7.C1 | length 67
  TOP LAYER w11.81: U7.C1@861.85,237.91 C30.1@928.9,237.91
DEC3: C32.1 U7.D23 | length 53.5
  TOP LAYER w10: U7.D23@625.63,247.76 v1(641.14,233.94)
  BOTTOM LAYER w10: v1(641.14,233.94) C32.1@673.83,233.94
DEC4_6: C57.2 C58.2 L14.2 U7.B5 U7.E24 | length 475.6
  TOP LAYER w5.91: U7.E24@605.94,257.6 605.94,240.14 v1(606,240.08) v1@606,238 ; C57.2@811.56,118.28 ccw(c808.96,120.88) C57.2@812.64,120.88
  TOP LAYER w10: C58.2@745.37,118.28 C57.2@811.56,118.28 ; C57.2@812.64,120.88 U7.B5@812.64,218.23
  TOP LAYER w15: C58.2@745.37,118.28 v1(745.37,150.35)
  BOTTOM LAYER w12: v1(606,240.08) 606,166 ccw(c621.65,166) 621.65,150.35 v1(745.37,150.35) L14.2@780.5,150.35
GND: A2.2 C5.2 C6.2 C7.2 C9.2 C10.1 C11.1 C14.1 C15.2 C16.2 C17.2 C18.2 C19.2 C20.1 C21.2 C22.2 C23.2 C24.1 C25.2 C26.1 C27.2 C28.2 C29.2 C30.2 C31.1 C32.2 C33.1 C34.1 C35.1 C36.1 C37.2 C38.2 C39.1 C40.2 C41.2 C42.2 C43.1 C44.1 C45.1 C46.1 C47.1 C48.1 C49.1 C50.2 C51.1 C52.1 C53.1 C54.2 C55.2 C56.1 C57.1 C58.1 C59.1 C60.2 CR1.1 F1.2 F1.3 F1.5 J1.2 J2.2 J3.0 J3.1 J3.2 J4.A1 J4.A12 J4.B1 J4.B12 J4.GND1 J4.GND2 J4.SH1 J4.SH2 J4.SH3 J4.SH4 J5.C5 J5.S1 J5.S2 J5.S3 J5.S4 L2.1 L3.1 L4.1 L5.1 L8.1 P1.3 P1.5 P1.9 Q1.2 Q2.2 Q3.2 R3.1 R7.2 R8.2 R9.2 R14.1 R15.2 R16.2 R22.1 R23.1 R24.1 R28.1 R30.1 R34.1 SW1.1 U1.15 U2.15 U3.1 U3.4 U4.1 U4.5 U4.6 U4.7 U4.8 U4.9 U4.11 U4.14 U4.17 U4.21 U4.27 U4.31 U4.36 U4.41 U4.44 U4.47 U4.50 U4.52 U4.56 U4.60 U4.62 U4.63 U4.65 U4.66 U4.68 U4.69 U4.72 U4.74 U4.75 U4.76 U4.77 U4.78 U4.79 U4.80 U4.81 U4.82 U4.85 U4.90 U4.94 U4.98 U4.103 U5.4 U5.5 U6.2 U6.15 U7.74 U7.B7 U7.F23 U8.2 U9.B1 U10.2 U11.6 U12.7 U12.9 U13.1 U13.4 U13.9 X1.2 X1.4 | length 11647.9
  TOP LAYER w5: CR1.1@292.14,289.66 v1(292.14,311) ; F1.3@330.1,286.91 F1.2@345.84,286.91 ; v1(345.84,245.88) F1.5@345.84,267.22 ; v1@572.9,532.9 v1(573,533) ; U7.B7@792.96,216.64 cw(c784.24,207.94) 796.56,207.94 v1@796.56,180.81 ; v1@794,182 v1@794,184.91 ; v1(856,34.2) 858,32.19 858.56,30.27 ccw(c872.2,34.2) 872.2,20 984,20 ccw(c984,28.13) 992.13,28.13 U11.6@992.13,49.77 ; v1(902.49,331.73) 906.64,325.18 ccw(c916.97,331.73) 916.97,319.5 C26.1@931,319.5 ; C38.2@941.93,403.1 C38.2@948.43,407.95 ; v1(971,219) 979.87,226.33 cw(c985.92,219) 985.92,228.5 C60.2@1015.91,228.5 ; Q1.2@978.76,407.95 Q1.2@987.81,411.82 Q1.2@979,424.32 ; SW1.1@1214,363 SW1.1@1214.64,363.64
  TOP LAYER w6: F1.2@345.84,286.91 v1(345.84,308.28) ; v1(442.8,2063.89) 503.29,2063.89 ccw(c503.29,2074.24) J1.2@513.64,2074.24 ; v1(455.65,1964.29) 507.45,1964.29 cw(c507.45,1958.1) J1.2@513.64,1958.1 ; C14.1@485,1478.5 C14.1@486.35,1479.85 ; v1(517.43,1499.49) v1(548.5,1499.49) C16.2@599,1499.49 ; v1(534.9,2263.09) 550.47,2263.09 cw(c550.47,2260.86) C9.2@552.7,2260.86 C9.2@552.82,2260.75 ; C15.2@535.38,1478.5 575.95,1478.5 ccw(c575.95,1516.15) C16.2@602.57,1489.53 ; L8.1@596.27,2261.85 cw(c597.51,2261.85) 597.51,2263.09 v1(627,2263.09) ; C11.1@680.43,2169.88 C11.1@680.31,2170 680.31,2208.82 R3.1@681.5,2210 ; v1@695,1340.94 v1(695,1341) ; v1(699,1444) v1@699,1444.09 ; 796.49,1522.83 cw(c796.49,1522) 797.31,1522 ; U4.103@797.31,1414.87 cw(c797.31,1407.29) U4.103@804.89,1407.29 ; U3.4@797.63,2216.04 v1(819,2216) ; v1(819,2216) 844.05,2216 cw(c844.05,2212.74) J2.2@847.31,2212.74 ; J2.2@928.02,2212.74 J2.2@928.02,2213 ; v1(959,1072) U10.2@993.32,1072 ; v1@965,2212.6 v1(965,2213) ; C19.2@1005.87,1277.45 1029.45,1277.45 ccw(c1029.45,1289) 1041,1289 1041,1340.94 U4.17@1041.11,1340.94 ; 1049.28,1544 ccw(c1050.77,1544) 1050.77,1542.51 ; L2.1@1051.44,2212 1051.44,2190.11 1053.92,2187.64 v1(1053.92,2185) ; U4.44@1124.57,1798.42 1177.99,1798.42 cw(c1177.99,1789.41) 1187,1789.41 v1(1187,1779) ; v1@1144,1463.77 v1(1144,1464) ; C24.1@1165.69,2269.48 1190.37,2269.48 L3.1@1190.37,2269.25 ; v1(1277,2289) 1277,2269.79 L4.1@1277.21,2269.79 ; C20.1@1305.31,1300.31 cw(c1307,1300.31) C20.1@1307,1302
  TOP LAYER w7.87: v1@644,1863.84 C10.1@644,1895 ; v1@670.65,1831.39 720.51,1831.39 U4.78@721.43,1832.3 ; v1@688.4,1798.42 U4.80@721.43,1798.42 ; v1(688.4,1864.69) 721.06,1864.74 U4.76@721.06,1877.16 ; v1@690.27,1916.53 U4.74@721.43,1916.53 ; v1@690.27,1960.62 U4.72@721.43,1960.62 ; U4.85@721.43,1699.99 v1@752.58,1699.99 ; U4.82@721.43,1759.05 v1@752.58,1759.05 ; U4.75@721.43,1896.84 v1@752.58,1896.84 ; v1@766,2186 766,2200.3 U3.1@766.13,2200.3 ; v1@785.2,1937.37 U4.69@785.2,1960.62 ; v1@844.24,1312.87 U4.7@844.24,1340.92 ; v1@844.26,1937.37 U4.66@844.26,1960.62 ; v1@883.61,1312.87 U4.9@883.63,1340.94 ; v1@903.31,1937.37 U4.63@903.31,1960.62 ; U4.11@923,1340.94 U4.11@923.15,1341.09 ; v1@923.15,1378.72 v1(923.3,1378.87) ; v1(962,1937) 962.19,1937.19 962.19,1960.44 U4.60@962.37,1960.62 ; v1@982.05,1371.97 986.29,1376.2 986.29,1378.87 ; v1@1041.11,1937.37 U4.56@1041.11,1960.62 ; v1(1094.04,1858.05) 1094.33,1857.76 1124.29,1857.76 U4.47@1124.44,1857.61 ; v1(1124,1302) v1@1124.29,1302.29 ; U4.21@1124.29,1340.65 U4.21@1124.57,1340.94 ; U4.36@1124.6,1640.96 v1@1154.93,1640.96 ; U4.41@1124.71,1739.5 v1@1155.87,1739.5 ; U4.50@1124.71,1916.66 v1@1155.87,1916.66
  TOP LAYER w10: v1(65.54,22.61) 83.37,22.61 cw(c83.37,21.23) 84.35,22.21 ; v1(106.15,296.7) ccw(c123.15,313.69) 123.15,289.66 C36.1@138,289.66 ; 135.53,22.21 cw(c136.51,21.23) 136.51,22.61 v1(158.58,22.61) ; 189,958 cw(c190.64,958) 190.64,959.64 v1(278.8,959.64) ; C35.1@256.88,289.66 CR1.1@292.14,289.66 ; C14.1@486.35,1479.85 v1(486.35,1499.49) ; v1@565.6,1601.57 U4.90@721.43,1601.57 ; U7.F23@625.63,267.44 v1(638.67,267.44) v1@639.67,267.44 ; v1@695,1340.94 U4.1@721.43,1340.94 ; v1@699,1444.09 U4.98@721.43,1444.09 ; U4.94@721.43,1522.83 796.49,1522.83 ; U4.81@721.43,1778.73 U4.80@721.43,1798.42 ; U4.79@721.43,1818.1 721.43,1832.3 U4.78@721.43,1837.79 ; U4.77@721.43,1857.47 U4.76@721.43,1877.16 ; U4.69@785.2,1960.62 U4.68@804.89,1960.62 ; U4.5@804.89,1340.94 U4.103@804.89,1407.29 ; U4.6@824.57,1340.94 824.57,1408.17 829.71,1413.3 v1(829.71,1414.86) ; U4.66@844.26,1960.62 U4.65@863.94,1960.62 ; U4.8@863.94,1340.94 U4.9@883.63,1340.94 ; C18.2@897.99,1224 C17.2@897.99,1277.45 ; U4.63@903.31,1960.62 U4.62@923,1960.62 ; U4.11@923.15,1341.09 v1@923.15,1378.72 ; J2.2@928.02,2213 v1(965,2213) C7.2@965,2247.04 ; v1@965,2212.6 L5.1@979.71,2212.6 ; U4.14@982.05,1340.94 v1@982.05,1371.97 ; R9.2@1035.01,2138.87 R8.2@1079.3,2138.87 ; U4.17@1041.26,1341.09 U4.103@1041.26,1413 ; 1050.77,1542.51 U4.31@1124.57,1542.51 ; R8.2@1080.01,2139.57 R7.2@1124.58,2139.57 ; v1@1124.29,1302.29 U4.21@1124.29,1340.65 ; U4.27@1124.57,1463.77 v1@1144,1463.77 ; U4.52@1124.57,1960.62 1126.9,1958.3 v1@1179.53,1958.3 ; R7.2@1125.01,2140 1129.01,2144 1134.63,2144 1148.19,2157.57 v1(1149.14,2157.57)
  TOP LAYER w15: v1(21.63,450.37) v1(21.63,655.09) 21.63,683.24 37.75,699.36 J3.0@44.44,699.36 176.11,699.36 cw(c176.11,676.48) 199,676.48 199,599 cw(c197,599) J3.2@197,597 ; 84.35,22.21 A2.2@84.35,58.05 ; v1(116.2,414.76) C52.1@143.64,414.76 ; v1(116.2,460.36) C53.1@143.64,460.36 ; A2.2@135.32,176.37 v1(135.32,221.21) ; 135.53,22.21 A2.2@135.53,58.05 ; 182.83,1211.5 v1(277.28,1211.5) v1(303.32,1211.5) C50.2@383.05,1211.5 ; v1(302,1083) U8.2@336.43,1083 ; v1(456.87,212.28) C34.1@456.87,239.72 ; C28.2@460.36,119.86 v1(460.36,147.3) ; R30.1@476.73,453 476.83,452.9 476.83,422.38 v1(476.93,422.28) ; R14.1@476.73,532.9 v1@572.9,532.9 ; v1(494.85,344) C37.2@520.5,344 C37.2@520.66,344 ; X1.4@508.36,129.36 v1(508.36,156.8) ; C33.1@553,240.08 556.5,240.08 562.16,245.74 578.66,245.74 v1(578.8,245.88) ; v1(565.18,34.2) X1.2@565.18,78.86 ; v1(610.64,34.2) C27.2@610.64,81.5 ; C40.2@625.63,556 v1(663.28,556) C42.2@742,556 C42.2@742,555.84 ; v1(652.27,33.48) C29.2@652.27,80.78 ; v1(745.37,33.98) C58.1@745.37,81.28 ; v1(811.56,33.98) C57.1@811.56,81.28 ; C55.2@845.4,555.84 C55.2@845.4,556 v1(845.4,581.65) ; v1(847.29,2181) J2.2@847.31,2212.74 J2.2@847.31,2287.54 ; v1(856,34.2) C31.1@856,81.5 ; v1(908,198) C30.2@931,198 ; v1(928,2181) J2.2@928.02,2212.74 ; J2.2@928.02,2213 J2.2@928.02,2287.54 ; C54.2@942,455 948.5,452 v1(979,452) Q1.2@979,424.32 ; C38.2@948.43,407.95 Q1.2@978.76,407.95 ; Q2.2@988,588.42 v1(988,616.65) ; Q3.2@988,764.82 v1(988,793.05) ; Q1.2@988.12,412.14 v1@1026.86,412.14 ; R22.1@1068.99,538.04 v1(1097.22,538.04) ; R23.1@1069,712.5 v1(1109.72,712.5) ; R24.1@1068.99,895.5 v1(1109.71,895.5) ; v1@1125,1302 C21.2@1257,1302 C20.1@1307,1302 ; C56.1@1137,319.5 v1(1171,319.5) ; v1(1214,319.5) SW1.1@1214,363 ; v1(1305.31,1258.84) C20.1@1305.31,1300.31
  TOP LAYER w20: U4.103@795.94,1566.35 U4.103@797.31,1566.35 ; U4.103@797.31,1487.61 U4.103@797.31,1492.24
  TOP LAYER w23: U4.103@986.29,1572.35 U4.103@1049.28,1572.35 ; U4.103@986.29,1651.09 U4.103@1049.28,1651.09
  TOP LAYER w23.5: U4.103@1049.28,1645.09 1049.28,1651.09 1049.28,1684.46
  TOP LAYER w25: U4.103@797.31,1487.61 797.31,1414.87 829.7,1414.87 U4.103@860.31,1414.87 ; U4.103@797.31,1492.24 U4.103@797.31,1493.61 ; v1(797.31,1911.31) U4.103@797.31,1887.31 ; v1(860.31,1378.87) U4.103@860.31,1414.87 ; v1(860.31,1911.31) U4.103@860.31,1887.31 ; v1(923.3,1378.87) 923.3,1408.87 U4.103@923.3,1414.87 ; v1(923.3,1911.31) U4.103@923.3,1887.31 ; v1(978.29,1378.87) 978.29,1408.87 U4.103@978.29,1414.87 ; v1(978.29,1911.31) U4.103@978.29,1887.31 ; U4.103@986.29,1572.35 U4.103@978.29,1572.35 ; U4.103@986.29,1651.09 U4.103@978.29,1651.09 ; U4.103@1049.28,1645.09 1049.28,1572.35 1049.28,1544 U4.103@1049.28,1493.61 ; 1049.28,1684.46 U4.103@1049.28,1729.83 ; v1(1049.28,1911.31) U4.103@1049.28,1887.31 ; U4.103@797.31,1493.61 U4.103@860.31,1493.61 ; U4.103@797.31,1493.61 797.31,1522 797.31,1566.35 U4.103@797.31,1572.35 ; U4.103@797.31,1572.35 U4.103@860.31,1572.35 ; U4.103@797.31,1572.35 797.31,1645.09 U4.103@797.31,1651.09 ; U4.103@797.31,1651.09 U4.103@860.31,1651.09 ; U4.103@797.31,1651.09 v1(797.31,1690.31) U4.103@797.31,1729.83 ; U4.103@797.31,1729.83 U4.103@860.31,1729.83 ; U4.103@797.31,1729.83 v1(797.31,1767.34) 797.31,1802.57 U4.103@797.31,1808.57 ; U4.103@797.31,1808.57 U4.103@860.31,1808.57 ; U4.103@797.31,1808.57 v1(797.31,1846.57) U4.103@797.31,1887.31 ; U4.103@797.31,1887.31 U4.103@860.31,1887.31 ; U4.103@860.31,1414.87 U4.103@923.3,1414.87 ; U4.103@860.31,1414.87 v1(860.31,1452.62) 860.31,1487.61 U4.103@860.31,1493.61 ; U4.103@860.31,1493.61 U4.103@923.3,1493.61 ; U4.103@860.31,1493.61 v1(860.31,1526.98) 860.31,1566.35 U4.103@860.31,1572.35 ; U4.103@860.31,1572.35 U4.103@923.3,1572.35 ; U4.103@860.31,1572.35 v1(860.31,1605.72) 860.31,1645.09 U4.103@860.31,1651.09 ; U4.103@860.31,1651.09 U4.103@923.3,1651.09 ; U4.103@860.31,1651.09 v1(860.31,1690.31) U4.103@860.31,1729.83 ; U4.103@860.31,1729.83 U4.103@923.3,1729.83 ; U4.103@860.31,1729.83 v1(860.31,1767.34) 860.31,1802.57 U4.103@860.31,1808.57 ; U4.103@860.31,1808.57 923,1808.57 U4.103@923.3,1808.57 ; U4.103@860.31,1808.57 v1(860.31,1846.57) U4.103@860.31,1887.31 ; U4.103@860.31,1887.31 923,1887.31 U4.103@923.3,1887.31 ; U4.103@923.3,1414.87 U4.103@978.29,1414.87 ; U4.103@923.3,1414.87 v1(923.3,1452.62) U4.103@923.3,1493.61 ; U4.103@923.3,1493.61 U4.103@978.29,1493.61 ; U4.103@923.3,1493.61 v1(923.3,1526.98) 923.3,1566.35 U4.103@923.3,1572.35 ; U4.103@923.3,1572.35 U4.103@978.29,1572.35 ; U4.103@923.3,1572.35 v1(923.3,1605.72) 923.3,1645.09 U4.103@923.3,1651.09 ; U4.103@923.3,1651.09 U4.103@978.29,1651.09 ; U4.103@923.3,1651.09 v1(923.3,1690.31) U4.103@923.3,1729.83 ; U4.103@923.3,1729.83 U4.103@978.29,1729.83 ; U4.103@923.3,1729.83 v1(923.3,1767.34) 923.3,1802.57 U4.103@923.3,1808.57 ; U4.103@923.3,1808.57 U4.103@978.29,1808.57 ; U4.103@923.3,1808.57 v1(923.3,1846.57) U4.103@923.3,1887.31 ; U4.103@923.3,1887.31 U4.103@978.29,1887.31 ; U4.103@978.29,1414.87 1049.28,1414.87 U4.103@1049.28,1493.61 ; U4.103@978.29,1414.87 v1(978.29,1452.62) 978.29,1487.61 U4.103@978.29,1493.61 ; U4.103@978.29,1493.61 U4.103@1049.28,1493.61 ; U4.103@978.29,1493.61 v1(978.29,1526.98) U4.103@978.29,1572.35 ; U4.103@978.29,1572.35 v1(978.29,1605.72) 978.29,1645.09 U4.103@978.29,1651.09 ; U4.103@978.29,1651.09 v1(978.29,1690.31) U4.103@978.29,1729.83 ; U4.103@978.29,1729.83 U4.103@1049.28,1729.83 ; U4.103@978.29,1729.83 v1(978.29,1767.34) 978.29,1802.57 U4.103@978.29,1808.57 ; U4.103@978.29,1808.57 U4.103@1049.28,1808.57 ; U4.103@978.29,1808.57 v1(978.29,1846.57) U4.103@978.29,1887.31 ; U4.103@978.29,1887.31 U4.103@1049.28,1887.31 ; U4.103@1049.28,1729.83 1049.28,1802.57 U4.103@1049.28,1808.57 ; U4.103@1049.28,1808.57 U4.103@1049.28,1887.31
  BOTTOM LAYER w5: R28.1@46.32,712.42 R28.1@48.9,715 ; C32.2@672.33,267.44 ccw(c672.33,268.94) C32.2@673.83,268.94 ; C41.2@701.5,382.21 cw(c701.5,375.98) 707.73,375.98 v1@707.73,357.15
  BOTTOM LAYER w6: R34.1@635.64,2113.25 645.14,2119.17 ccw(c635.64,2130.29) 645.33,2119.34 v1(657.7,2130.29) ; U9.B1@697.05,2154.25 709.23,2154.25 cw(c709.23,2144.7) 718.79,2144.7 718.79,2130.29 v1(719.1,2130.29) ; v1(955.69,1572.34) 1020.16,1572.34 cw(c1020.16,1563) C23.2@1029.5,1563 ; v1(1148.9,2402.4) 1150.4,2400.9 1150.4,2383.84 1157.24,2377 C5.2@1158.49,2377 ; C6.2@1149.69,2279 ccw(c1153.69,2279) 1149.72,2278.49 ccw(c1153.69,2279) 1153.69,2275 C6.2@1154.33,2275 ; 1156,2140 1156,2269.69 ccw(c1146.69,2269.69) C6.2@1154.33,2275 ; v1(1178,2275) C6.2@1154.33,2275
  BOTTOM LAYER w10: R16.2@52.5,1046 52.5,912.77 ccw(c55.46,912.77) J4.SH4@55.46,909.8 ; J4.SH3@55.46,1260.2 133,1260.2 ; R15.2@133,1143 133,1260.2 ; J4.SH1@181.45,1260.2 133,1260.2 ; J5.S4@893.73,1200.38 ccw(c883.42,1210.68) 898,1210.68 v1(898,1251)
  BOTTOM LAYER w12: v1(1305.31,1258.84) U5.4@1305.31,1275.6
  BOTTOM LAYER w15: v1(46.32,655.09) R28.1@46.32,712.42 ; v1(175,665) C51.1@200.78,665 ; C44.1@350.36,1172.59 C43.1@394.68,1172.59 C39.1@439,1172.59 ; v1(439,1152) C39.1@439,1172.59 ; C49.1@439,1353.56 v1(439,1381) ; C39.1@439.32,1172.59 C39.1@439,1172.59 ; v1@639.67,267.44 C32.2@672.33,267.44 ; v1(683.18,923.38) C59.1@708.95,923.38 ; C45.1@683.36,1287.56 v1(683.36,1315) ; C45.1@683.72,1287.56 v1(848.31,1287.56) ; J5.C5@805.94,873 v1(852.5,873) ; v1(858.85,644.69) J5.S3@858.85,676.49 ; v1(1246,51.78) P1.9@1297.47,51.78 P1.9@1311.25,51.78 ; v1(1246,152) P1.5@1314,152 ; v1(1246,202) P1.3@1314,202 ; C25.2@1258,1394.5 C25.2@1268,1395 ; C25.2@1268,1394.5 v1(1283,1394.5) ; v1(1273.2,1190) J5.S1@1331.29,1190 ; v1(1311.29,644.69) J5.S2@1311.29,676.49